# Altium PCB USB_C (male)_FFC-v1.0.0.PcbDoc
Units mil, origin at the board's own origin, x right, y up, seen from the top; angles counter-clockwise.
Board outline 511.81 x 551.18 mil, 2 copper layers (Top Layer, Bottom Layer), stack 61.811 mil thick; 8 components, 15 nets, 54 pads, 35 vias.
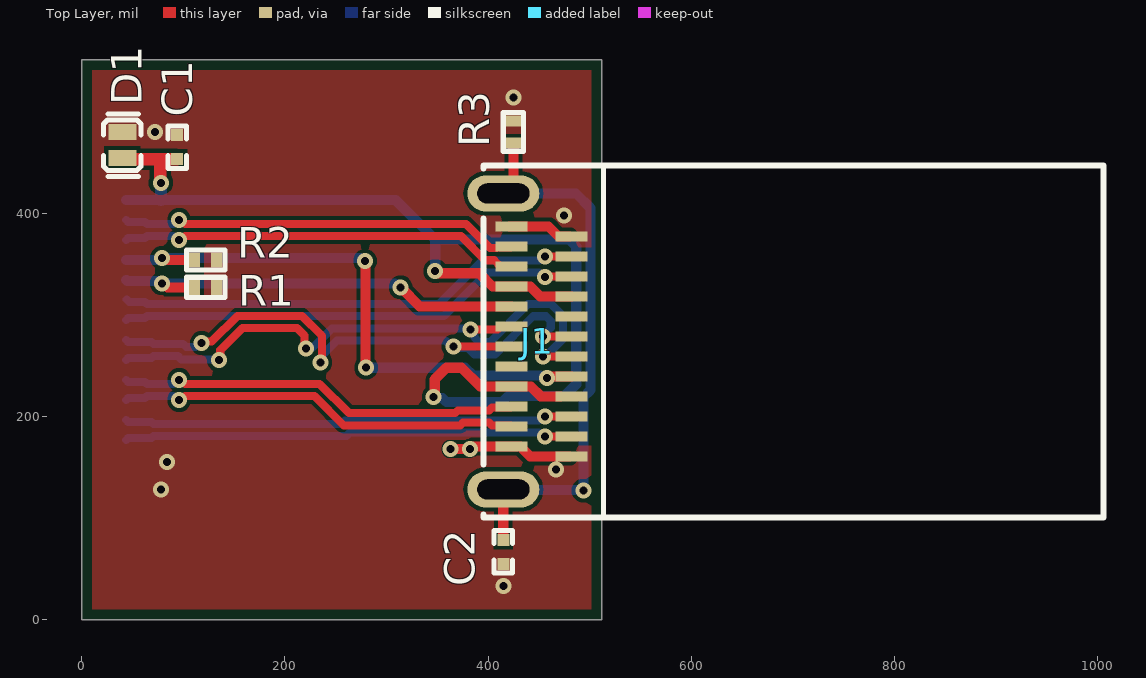
[diagram p0: Top Layer view]
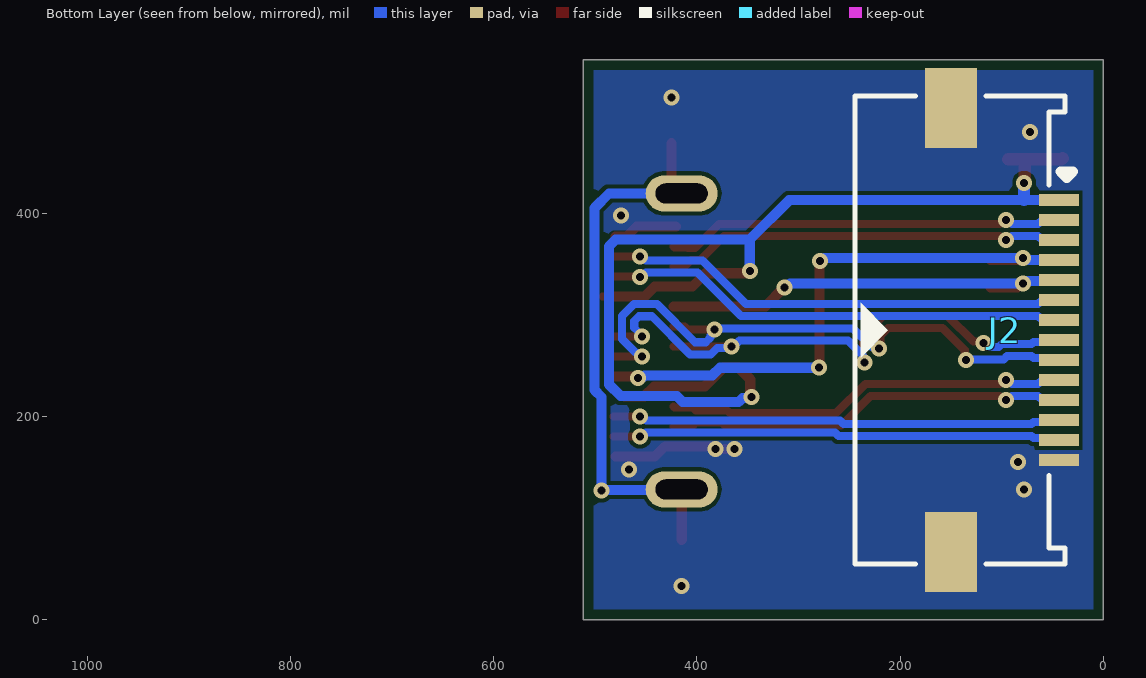
[diagram p1: Bottom Layer view, seen from below]

## Layer stack, top to bottom
Top Solder: solder mask 0.4, Solder Resist, Dk 4.8
Top Layer: signal copper 1.378
Dielectric 1: dielectric 59.055, FR-4, Dk 4.8
Bottom Layer: signal copper 1.378
Bottom Solder: solder mask 0.4, Solder Resist, Dk 4.8

## Board outline
0,0 0,551.18 511.81,551.18 511.81,0

## Design rules (kind name [scope] priority, off if disabled: settings)
BoardOutlineClearance BoardOutlineClearance_1 [All] p1: gap=0 ignorepadtopadclearanceinfootprint=FALSE except(10: Poly-OutlineEdge)
Clearance [All] p1: gap=4 ignorepadtopadclearanceinfootprint=TRUE
DiffPairsRouting [InDifferentialPairClass('USB')] p1: maxlimit=4 minlimit=4 mostfreqgap=4 toplayer_minwidth=8 toplayer_maxwidth=8 toplayer_prefwidth=8 bottomlayer_minwidth=8 bottomlayer_maxwidth=8 bottomlayer_prefwidth=8 impedanceprofiledriven=TRUE impedanceprofileid={E32DE698-A52B-4E28-84C5-D083E1A636D6} impedanceprofilevalue=90.000000 maxuncoupledlength=500
MinimumSolderMaskSliver [All] p1: minsoldermaskwidth=2
PolygonConnect [All] p1: connectstyle=Direct reliefconductorwidth=10 reliefentries=4 polygonreliefangle="90 Angle" airgapwidth=10
RoutingVias [All] p1: holewidth=7.87 width=15.75 viastyle="Through Hole" minholewidth=7.87 minwidth=15.75 maxholewidth=7.87 maxwidth=15.75
SilkToSilkClearance [All] p1: silktosilkclearance=2
SilkToSolderMaskClearance [IsPad] p1: minsilkscreentomaskgap=2 clearancetoexposedcopper=TRUE
SolderMaskExpansion [All] p1: expansion=4 istentingtop=FALSE
Width [All] p1: maxlimit=20 minlimit=6 preferedwidth=10 minimp=50.000000 maximp=50.000000 favimp=50.000000
26 further rules are at their usual default settings.

## Classes and differential pairs
differential pair class USB: TYPEC TYPEC_RX1 TYPEC_RX2 TYPECTX1 TYPECTX2
differential pair TYPECTX2: +TYPECTX2_P -TYPECTX2_N
differential pair TYPECTX1: +TYPECTX1_P -TYPECTX1_N
differential pair TYPEC: +TYPEC_P -TYPEC_N
differential pair TYPEC_RX2: +TYPEC_RX2_P -TYPEC_RX2_N
differential pair TYPEC_RX1: +TYPEC_RX1_P -TYPEC_RX1_N

## Components (designator, comment, footprint, x,y, rotation, side; value= is the part's Value field where it differs from the comment)
C1 "0.1uF" CAP-0201 94,465 r90 top
C2 "DNP" CAP-0201 415,66.81 r90 top value=4.7nF
D1 "DNP" "DFN1006-2L (Bi-Directional)" 40,467 r90 top
J1 "USB4155-03-C" USB4155-03-C 448.54,273.82 r90 top locked
J2 "5051101492" 5051101492 97,285 r270 bottom locked
R1 "DNP" Res-0201 122,327 r180 top value=5.1kR
R2 "DNP" Res-0201 122,354 r180 top value=5.1kR
R3 "DNP" Res-0201 425,480 r270 top value=1MR

## Footprints (in the part's own frame and the unit in brackets; to place one, negate y for a bottom-side part, rotate by r counter-clockwise, add the part's x,y. Pads: shape width x height; smd on the part's side, far side on the other; paste and mask are expansions set on the pad)
5051101492 [mm]
  rect 0.3x1 smd paste+0 mask+0.05: 1(-3.25,1.35) 2(-2.75,1.35) 3(-2.25,1.35) 4(-1.75,1.35) 5(-1.25,1.35) 6(-0.75,1.35) 7(-0.25,1.35) 8(0.25,1.35) 9(0.75,1.35) 10(1.25,1.35) 11(1.75,1.35) 12(2.25,1.35) 13(2.75,1.35) 14(3.25,1.35)
  rect 2x1.3 smd paste+0 mask+0.05: S1(-5.55,-1.35) S2(5.55,-1.35)
  silkscreen extent -5.85,-3.75 5.85,1.7, body extent -6.25,-3.76 6.25,1.54, height 1.9
CAP-0201 [mm]
  rect 0.3x0.3 smd mask+0.055: 1(-0.3,0) 2(0.3,0)
  silkscreen extent -0.53,-0.23 0.53,0.23, body extent -0.3,-0.15 0.3,0.15, height 0.28
"DFN1006-2L (Bi-Directional)" [mm]
  rect 0.4x0.7 smd paste+0 mask+0.051: 1(-0.325,0) 2(0.325,0)
  silkscreen extent -0.78,-0.47 0.78,0.47, body extent -0.5,-0.3 0.5,0.3, height 0.47
Res-0201 [mm]
  rect 0.27x0.37 smd mask+0.055: 1(-0.275,0) 2(0.275,0)
  silkscreen extent -0.48,-0.25 0.48,0.25, body extent -0.3,-0.15 0.3,0.15, height 0.29
USB4155-03-C [mm]
  rect 0.25x0.8 smd paste-100 mask+0.05: A1(2.875,0.65) A2(2.375,0.65) A3(1.875,0.65) A4(1.375,0.65) A5(0.875,0.65) A6(0.375,0.65) A7(-0.125,0.65) A8(-0.625,0.65) A9(-1.125,0.65) A10(-1.625,0.65) A11(-2.125,0.65) A12(-2.625,0.65) B1(-2.875,-0.85) B2(-2.375,-0.85) B3(-1.875,-0.85) B4(-1.375,-0.85) B5(-0.875,-0.85) B6(-0.375,-0.85) B7(0.125,-0.85) B8(0.625,-0.85) B9(1.125,-0.85) B10(1.625,-0.85) B11(2.125,-0.85) B12(2.625,-0.85)
  oval 0.9x1.8 hole 0.5 slot 1.3 at 90 deg paste-2539.97 mask+0.05: S1(-3.7,0.85) S2(3.7,0.85)
  silkscreen extent -4.4,-14.15 4.4,1.35, body extent -4.39,-14.15 4.41,1.35, height 1.6

## Part data
C1: library part GRM033R61E104ME14D, "CAP CER 0.1UF 25V X5R 0201", LCSC Part Number=C2649557, Manufacturer=Murata, Voltage Rating (DC)=25V, ComponentLink1Description=https://datasheet.octopart.com/GRM033R61E104ME14D-Murata-datasheet-96224008.pdf?src-supplier=Future+Electronics, ComponentLink1URL=https://datasheet.octopart.com/GRM033R61E104ME14D-Murata-datasheet-96224008.pdf?src-supplier=Future+Electronics, ComponentLink2Description=http://search.murata.co.jp/Ceramy/image/img/A01X/G101/ENG/GRM033R61E104ME14-01.pdf?src-supplier=Digikey, ComponentLink2URL=http://search.murata.co.jp/Ceramy/image/img/A01X/G101/ENG/GRM033R61E104ME14-01.pdf?src-supplier=Digikey, ComponentLink3Description=http://psearch.en.murata.com/capacitor/product/GRM033R61E104ME14%23.pdf?src-supplier=Avnet, ComponentLink3URL=http://psearch.en.murata.com/capacitor/product/GRM033R61E104ME14%23.pdf?src-supplier=Avnet, Height=330um, Item Type=Capacitors, Manufacturer Part Number=GRM033R61E104ME14D, Material=4241ConductorMaterial, Pricing="15000=0.0037, 45000=0.0036, 75000=0.0035, 300000=0.0034, 450000=0.0033 (USD)", RoHS=Yes, Stock=270000, Supplier="Future Electronics"
C2: library part GRM033R61E472MA12D, "CAP CER 4700PF 25V X5R 0201", Case Code (Imperial)=0201, Case Code (Metric)=0603, Dielectric=X5R, Manufacturer=Murata, Max Operating Temperature=85°C, Min Operating Temperature=-55°C, Package Quantity=15000, Supplier Part Number=81-GRM33R61E472MA12D, Tolerance=20%, Voltage Rating=25V, Case/Package=0201, ComponentLink1Description=http://www.mouser.com/ds/2/281/c02e-2905.pdf?src-supplier=Mouser, ComponentLink1URL=http://www.mouser.com/ds/2/281/c02e-2905.pdf?src-supplier=Mouser, ComponentLink2Description=http://search.murata.co.jp/Ceramy/image/img/A01X/G101/ENG/GRM033R61E472MA12-01.pdf?src-supplier=Digikey, ComponentLink2URL=http://search.murata.co.jp/Ceramy/image/img/A01X/G101/ENG/GRM033R61E472MA12-01.pdf?src-supplier=Digikey, ComponentLink3Description=https://search.murata.co.jp/Ceramy/image/img/A01X/G101/ENG/GRM033R61E472MA12-01.pdf?src-supplier=Digikey, ComponentLink3URL=https://search.murata.co.jp/Ceramy/image/img/A01X/G101/ENG/GRM033R61E472MA12-01.pdf?src-supplier=Digikey, Height=0.3mm, Item Type=Capacitors, Length=0.024inch, Manufacturer Part Number=GRM033R61E472MA12D, Material=4241ConductorMaterial, Mounting Technology="Surface Mount", Packaging="Tape and Reel", Pricing="1=0.1, 10=0.008, 50=0.008, 100=0.005, 1000=0.004, 10000=0.004 (USD)", RoHS=Yes, RoHS Compliant=Yes, Series=GRM, Stock=77158, Supplier=Mouser, Termination=SMD/SMT, Thickness=0.013inch, Voltage Rating (DC)=25V, Weight=1.2E-05oz, Width=0.012inch
D1: library part ESD5451N, "DFN1006-2(0402) ESD Protection Devices ROHS", LCSC Part Number=C2936977, Manufacturer="TECH PUBLIC", ComponentLink1Description=LCSC, ComponentLink1URL=https://www.lcsc.com/product-detail/span-style-background-color-ff0-ESD-span-Protection-Devices_TECH-PUBLIC-ESD5451N_C2936977.html, Manufacturer Part Number=ESD5451N
J1: "USB Connectors USB Type C, Plug, SMT , G/F, Right Angled Mount, T R", LCSC Part Number=C5183853, Manufacturer="Global Connector Technology", Supplier Part Number=2073-USB4155-03-CCT-ND, Category="USB Connectors", ComponentLink1Description=https://datasheet.octopart.com/USB4155-03-C-Global-Connector-Technology-datasheet-169726654.pdf?src-supplier=Future+Electronics, ComponentLink1URL=https://datasheet.octopart.com/USB4155-03-C-Global-Connector-Technology-datasheet-169726654.pdf?src-supplier=Future+Electronics, Item Type=Connector, Manufacturer Part Number=USB4155-03-C, Pricing="1=1.61, 10=1.371, 25=1.2856, 50=1.224, 100=1.1654, 250=1.0924, 500=1.04024 (USD)", RoHS=No, Stock=334, Supplier=Digikey
J2: "14 Position FFC, FPC Connector Contacts, Bottom 0.020\" (0.50mm) Surface Mount, Right Angle", LCSC Part Number=C3169593, Manufacturer=Molex, Manufacturer Part Number=505110-1492, Category="FFC / FPC", ComponentLink1Description=http://www.alliedelec.com/m/d/498d8ef60ec1840486550b3bb04c7a47.pdf?src-supplier=Allied+Electronics, ComponentLink1URL=http://www.alliedelec.com/m/d/498d8ef60ec1840486550b3bb04c7a47.pdf?src-supplier=Allied+Electronics, ComponentLink2Description=https://media.digikey.com/pdf/Data%20Sheets/Molex%20PDFs/FFC-FPC_Connectors.pdf?src-supplier=Digikey, ComponentLink2URL=https://media.digikey.com/pdf/Data%20Sheets/Molex%20PDFs/FFC-FPC_Connectors.pdf?src-supplier=Digikey, ComponentLink3Description=https://datasheet.octopart.com/505110-1492-Molex-datasheet-77521073.pdf?src-supplier=Element14, ComponentLink3URL=https://datasheet.octopart.com/505110-1492-Molex-datasheet-77521073.pdf?src-supplier=Element14, ComponentLink4Description=http://www.farnell.com/datasheets/2014276.pdf?src-supplier=Element14, ComponentLink4URL=http://www.farnell.com/datasheets/2014276.pdf?src-supplier=Element14, ComponentLink5Description=https://www.molex.com/datasheets/rohspdf/5051101492_rohs.pdf?src-supplier=Digikey, ComponentLink5URL=https://www.molex.com/datasheets/rohspdf/5051101492_rohs.pdf?src-supplier=Digikey, ComponentLink6Description=https://datasheet.octopart.com/505110-1492-Molex-datasheet-62088043.pdf?src-supplier=Farnell, ComponentLink6URL=https://datasheet.octopart.com/505110-1492-Molex-datasheet-62088043.pdf?src-supplier=Farnell, ComponentLink7Description=https://datasheet.octopart.com/505110-1492-Molex-datasheet-134576216.pdf?src-supplier=TME, ComponentLink7URL=https://datasheet.octopart.com/505110-1492-Molex-datasheet-134576216.pdf?src-supplier=TME, ComponentLink8Description=https://datasheet.octopart.com/505110-1492-Molex-datasheet-154754609.pdf?src-supplier=Master+Electronics, ComponentLink8URL=https://datasheet.octopart.com/505110-1492-Molex-datasheet-154754609.pdf?src-supplier=Master+Electronics, Item Type=Connector, Pricing="9000=0.3633, 15000=0.3615 (USD)", RoHS=Yes, Stock=9000, Supplier="Arrow Electronics", Supplier Part Number=505110-1492
R1 R2: library part RC0201FR-075K1L, "RES 5.1K OHM 1% 1/20W 0201", Case Code (Imperial)=0201, Case Code (Metric)=0603, LCSC Part Number=C274341, Manufacturer=Yageo, Max Operating Temperature=125°C, Max Power Dissipation=50mW, Min Operating Temperature=-55°C, Supplier Part Number=9072847, Temperature Coefficient=200ppm/°C, Tolerance=1%, Voltage Rating=25V, Case/Package=0201, Category="Chip SMD Resistors", ComponentLink1Description=http://www.mouser.com/ds/2/447/RC0201-559633.pdf?src-supplier=Mouser, ComponentLink1URL=http://www.mouser.com/ds/2/447/RC0201-559633.pdf?src-supplier=Mouser, ComponentLink2Description=https://datasheet.octopart.com/RC0201FR-075K1L-Yageo-datasheet-164759695.pdf?src-supplier=Future+Electronics, ComponentLink2URL=https://datasheet.octopart.com/RC0201FR-075K1L-Yageo-datasheet-164759695.pdf?src-supplier=Future+Electronics, ComponentLink3Description=http://www.yageo.com/documents/recent/PYu-RC_Group_51_RoHS_L_10.pdf?src-supplier=Digi-Key, ComponentLink3URL=http://www.yageo.com/documents/recent/PYu-RC_Group_51_RoHS_L_10.pdf?src-supplier=Digi-Key, Features="Moisture Resistant", Height=0.23mm, Item Type=Resistor, Lead Free="Lead Free", Length=0.6mm, Manufacturer Part Number=RC0201FR-075K1L, Number of Terminations=2, Packaging="Tape and Reel", Power Rating=50mW, Pricing="10000=0.0014, 40000=0.0013, 200000=0.0013, 400000=0.0012, 1250000=0.0011 (USD)", RoHS=Yes, RoHS Compliant=Yes, Series=RC, Stock=280000, Supplier="Future Electronics", Termination=SMD/SMT, Width=0.3mm
R3: library part RC0201FR-071ML, "RES 1M OHM 1% 1/20W 0201", Case Code (Imperial)=0201, Case Code (Metric)=0603, LCSC Part Number=C295786, Manufacturer=Yageo, Max Operating Temperature=125°C, Max Power Dissipation=50mW, Min Operating Temperature=-55°C, Package Quantity=10000, Resistance Tolerance=1%, Resistor Type="Thick Film", Temperature Coefficient=200ppm/°C, Voltage Rating=25V, Case/Package=0201, ComponentLink1Description=https://datasheet.ciiva.com/29721/pyu-r-int-thick-7-29721005.pdf?src-supplier=Digikey, ComponentLink1URL=https://datasheet.ciiva.com/29721/pyu-r-int-thick-7-29721005.pdf?src-supplier=Digikey, ComponentLink2Description=https://datasheet.ciiva.com/29721/pyu-r-int-thick-7-29721006.pdf?src-supplier=Digikey, ComponentLink2URL=https://datasheet.ciiva.com/29721/pyu-r-int-thick-7-29721006.pdf?src-supplier=Digikey, ComponentLink3Description=https://datasheet.ciiva.com/7672/1563626-7672207.pdf?src-supplier=Element14, ComponentLink3URL=https://datasheet.ciiva.com/7672/1563626-7672207.pdf?src-supplier=Element14, ComponentLink4Description=https://datasheet.ciiva.com/22698/1563626-22698507.pdf?src-supplier=Element14, ComponentLink4URL=https://datasheet.ciiva.com/22698/1563626-22698507.pdf?src-supplier=Element14, ComponentLink5Description=https://datasheet.ciiva.com/25647/pyu-r-int-thick-7-25647311.pdf?src-supplier=Digikey, ComponentLink5URL=https://datasheet.ciiva.com/25647/pyu-r-int-thick-7-25647311.pdf?src-supplier=Digikey, Construction=Rectangular, Contact Plating=Tin,Matte, Depth=0.3mm, Features="Moisture Resistant", Height=0.01inch, Item Type=Resistor, Lead Free=5697LeadFree, Length=0.6mm, Manufacturer Part Number=RC0201FR-071ML, Military Standard=Not, Number of Terminations=2, Packaging="Tape and Reel", Power Rating=50mW, Pricing="1=0.104, 25=0.016, 100=0.008, 250=0.007, 1000=0.006 (USD)", Reach SVHC Compliant=Unknown, RoHS=Yes, RoHS Compliant=Yes, Series=RC, Stock=13025, Supplier=Avnet, Termination=SMD/SMT, Tolerance=1%, Voltage Rating (DC)=25V, Width=0.3mm

## Via types
v1: diameter 15.75, hole 7.87, Top Layer to Bottom Layer, 35 vias

## Nets (pads, with @x,y where several pads share a name; then routed paths per layer and width w, separated by ;. In a path a pad name is that pad's centre, name@x,y a point inside that pad or via, vN(x,y) a via of type N, cw(c..) or ccw(c..) an arc to the next point about the centre after c; other vN are vias at no path point)
GND: C1.2 C2.1 D1.2 J1.A1 J1.A12 J1.B1 J1.B12 J2.14 J2.S1 J2.S2 R1.1 R2.1 R3.1 | length 184.9
  Top Layer w10: v1(363,168) 363.08,168.08 381.92,168.08 v1(382,168.16) ; v1@382,169 384.39,169 385.86,170.47 431.62,170.47 441.46,160.63 J1.B1@480,160.63 ; J1.A1@420.95,387.01 459.49,387.01 469.33,377.17 J1.B12@480,377.17
  other v1: 415,33 78,128 467,148 84,155 475,398 72,480 425,514
Shield: C2.2 J1.S1 J1.S2 R3.2 | length 555.4
  Top Layer w10: C2.2 415,128.07 J1.S1 ; J1.S2 425,429.42 R3.2
  Bottom Layer w10: J1.S2 486.51,419.49 500.74,405.26 500.74,225.94 494,219.2 v1(494,127) 493.43,127.57 415.65,127.57 J1.S1
TYPEC_CC1: J1.A5 J2.5 R1.2 | length 423.7
  Top Layer w10: v1(79,331) 80.56,331 84.56,327 R1.2 ; v1(314,327) 332.73,308.27 J1.A5
  Bottom Layer w10: J2.5 44.76,333.31 75.13,333.31 77.44,331 v1(79,331) 308.44,331 312.44,327 v1(314,327)
TYPEC_CC2: J1.B5 J2.4 R2.2 | length 582.4
  Top Layer w10: v1(79,356) 80.56,356 82.56,354 R2.2 ; v1(279,353) 279.5,352.5 279.5,248.5 v1(280,248) ; v1(458,238) 459.56,238 460.85,239.29 481.92,239.29 J1.B5
  Bottom Layer w10: J2.4 75.34,353.9 77.44,356 v1(79,356) 274.44,356 277.44,353 v1(279,353) ; v1(280,248) 377.37,248 384.97,240.41 451.53,240.41 452.84,239.1 456.9,239.1 v1(458,238)
TYPEC_N: J1.A7 J1.B7 J2.8 | length 601.4
  Top Layer w8: v1(118.21,272.23) 119.69,273.72 128,273.72 153.28,299 216.93,299 236.56,279.37 236.56,260.42 236.48,260.35 236.48,254.48 v1(235,253) ; v1(366,268.87) J1.A7@422.93,268.88 ; v1(454,278.77) J1.B7@481.98,278.76
  Bottom Layer w8: J2.8 45.76,273.25 68.63,273.25 70.57,271.32 99.92,271.32 103.02,268.22 112.1,268.22 116.11,272.23 v1(118.21,272.23) ; v1@236.48,259.96 251.21,274.68 358.08,274.68 363.9,268.87 v1(366,268.87) 367.48,267.38 380,267.38 386.38,261 406.79,261 444.44,298.65 457.05,298.65 461.74,293.96 461.74,287.33 454,279.59 v1(454,278.77)
TYPEC_P: J1.A6 J1.B6 J2.9 | length 613.7
  Top Layer w8: v1(135,255.44) 136.48,256.92 136.48,265.23 158.25,287 211.96,287 219.2,279.76 219.2,268.48 v1(220.69,267) ; v1(382.79,285.66) 409.2,285.66 412.12,288.58 J1.A6 ; v1(454,259.03) J1.B6@481.98,259.04
  Bottom Layer w8: J2.9 45.76,257.38 68.63,257.38 70.57,259.32 94.95,259.32 98.05,256.22 134.22,256.22 v1(135,255.44) ; v1@228,268.45 246.24,286.68 381.77,286.68 v1(382.79,285.66) 382.79,283.56 386.67,279.69 386.67,277.69 391.35,273 401.82,273 439.47,310.65 462.02,310.65 473.74,298.93 473.74,276.07 460.58,262.9 459.97,262.9 456.1,259.03 v1(454,259.03)
TYPEC_RX1_N: J1.B10 J2.7 | length 459.4
  Top Layer w8: v1(456,337.47) 456.16,337.64 481.84,337.64 J1.B10
  Bottom Layer w8: J2.7 45.76,296.75 62.28,296.75 64.22,298.68 356.66,298.68 399.61,341.64 450.03,341.64 454.2,337.47 v1(456,337.47)
TYPEC_RX1_P: J1.B11 J2.6 | length 458.8
  Top Layer w8: v1(456,357.22) 456.13,357.35 481.87,357.35 J1.B11
  Bottom Layer w8: J2.6@44.4,315.08 46.85,312.62 62.28,312.62 64.22,310.68 351.68,310.68 394.64,353.64 450.33,353.64 453.9,357.22 v1(456,357.22)
TYPEC_RX2_N: J1.A10 J2.10 | length 390.9
  Top Layer w8: v1(96,235.82) 98.1,235.82 101.97,231.95 234.27,231.95 262.96,203.25 367.67,203.25 370.42,206 401.15,206 404.07,208.92 422.03,208.92 J1.A10
  Bottom Layer w8: J2.10 45.76,233.88 62.28,233.88 64.22,231.95 v1@90.03,231.95
TYPEC_RX2_P: J1.A11 J2.11 | length 390.9
  Top Layer w8: v1(96,216.07) 98.1,216.07 101.97,219.95 229.3,219.95 257.99,191.25 372.64,191.25 375.39,194 401.15,194 404.07,191.08 422.03,191.08 J1.A11
  Bottom Layer w8: J2.11 45.76,218.01 62.28,218.01 64.22,219.95 v1@90.03,219.95
TYPECTX1_N: J1.A3 J2.3 | length 388.7
  Top Layer w8: v1(96,373.55) 98.1,373.55 101.97,377.43 373.35,377.43 397.07,353.71 406.06,353.71 412.12,347.64 J1.A3
  Bottom Layer w8: J2.3 45.76,375.49 62.28,375.49 64.22,377.43 v1@90.03,377.43
TYPECTX1_P: J1.A2 J2.2 | length 386.8
  Top Layer w8: v1(96,393.3) 98.1,393.3 101.97,389.43 378.32,389.43 402.04,365.71 408.67,365.71 409.36,366.4 422.03,366.4 J1.A2
  Bottom Layer w8: J2.2 45.76,391.36 62.28,391.36 64.22,389.43 v1@90.03,389.43
TYPECTX2_N: J1.B2 J2.13 | length 442.9
  Top Layer w8: v1(456.19,180.04) 456.33,180.18 481.86,180.18 J1.B2
  Bottom Layer w8: J2.13 45.76,178.64 68.63,178.64 70.57,180.57 260.57,180.57 264.03,184.04 450.1,184.04 454.09,180.04 v1(456.19,180.04)
TYPECTX2_P: J1.B3 J2.12 | length 442.8
  Top Layer w8: v1(456,200.03) J1.B3
  Bottom Layer w8: J2.12 45.76,194.51 68.63,194.51 70.57,192.57 255.6,192.57 259.06,196.04 449.91,196.04 453.9,200.03 v1(456,200.03)
VBUS: C1.1 D1.1 J1.A4 J1.A9 J1.B4 J1.B9 J2.1 | length 1184.8
  Top Layer w8: J1.B9 J1.B9@492.83,318.11
  Top Layer w10: v1(346.42,219.13) 347.52,220.23 347.52,236.51 359.01,248 373.81,248 392.2,229.61 422.87,229.61 J1.A9 442.15,229.53 451.91,219.77 J1.B4@471.25,219.77 ; v1@349,341 391.39,341 404.44,327.95 J1.A4 423.03,327.87 441.49,327.87 451.25,318.11 J1.B9
  Top Layer w12: D1.1 41.02,453.19 76,453.19 ; v1(78,430) 77.28,430.72 77.28,451.91 76,453.19 ; C1.1 76,453.19
  Bottom Layer w10: J2.1 78,412.95 309.14,412.95 348,374.09 ; v1(346.42,219.13) 347.52,218.03 355.24,218.03 359.01,214.25 414.13,214.25 419.96,220.09 475.09,220.09 486.74,231.74 486.74,367.26 479.91,374.09 348,374.09 ; v1(348,343.04) 348,374.09
  Bottom Layer w12: 78,412.95 v1(78,430)
pads on no net: J1.A8 J1.B8

## Polygon pours and split planes (outlines as drawn)
GND on Bottom Layer "GND_L02_P001" (solid, remove dead copper, pour order 1): 0,0 0,551.18 511.81,551.18 511.81,0
GND on Top Layer "GND_L01_P000" (solid, remove dead copper, pour order 0): 0,0 0,551.18 511.81,551.18 511.81,0

## Silkscreen, mask and mechanical layers (free items; w line width, h text height)
Board Outline:
  the board outline again, w5

## Dimensions
0,551.18 to 0,0 on Top Overlay
0,551.18 to 511.81,551.18 on Top Overlay